# Altium PCB slave.PcbDoc (part 4 of 7)
Units mil, origin at the board's own origin, x right, y up, seen from the top; angles counter-clockwise.
Board outline 6299.21 x 3937.01 mil, 6 copper layers (Top Copper, FUSED_VBAT-, Signal Layer 2, Signal Layer 3, VREG, Bot Copper), stack 65.355 mil thick; 495 components, 307 nets, 1435 pads, 1866 vias.
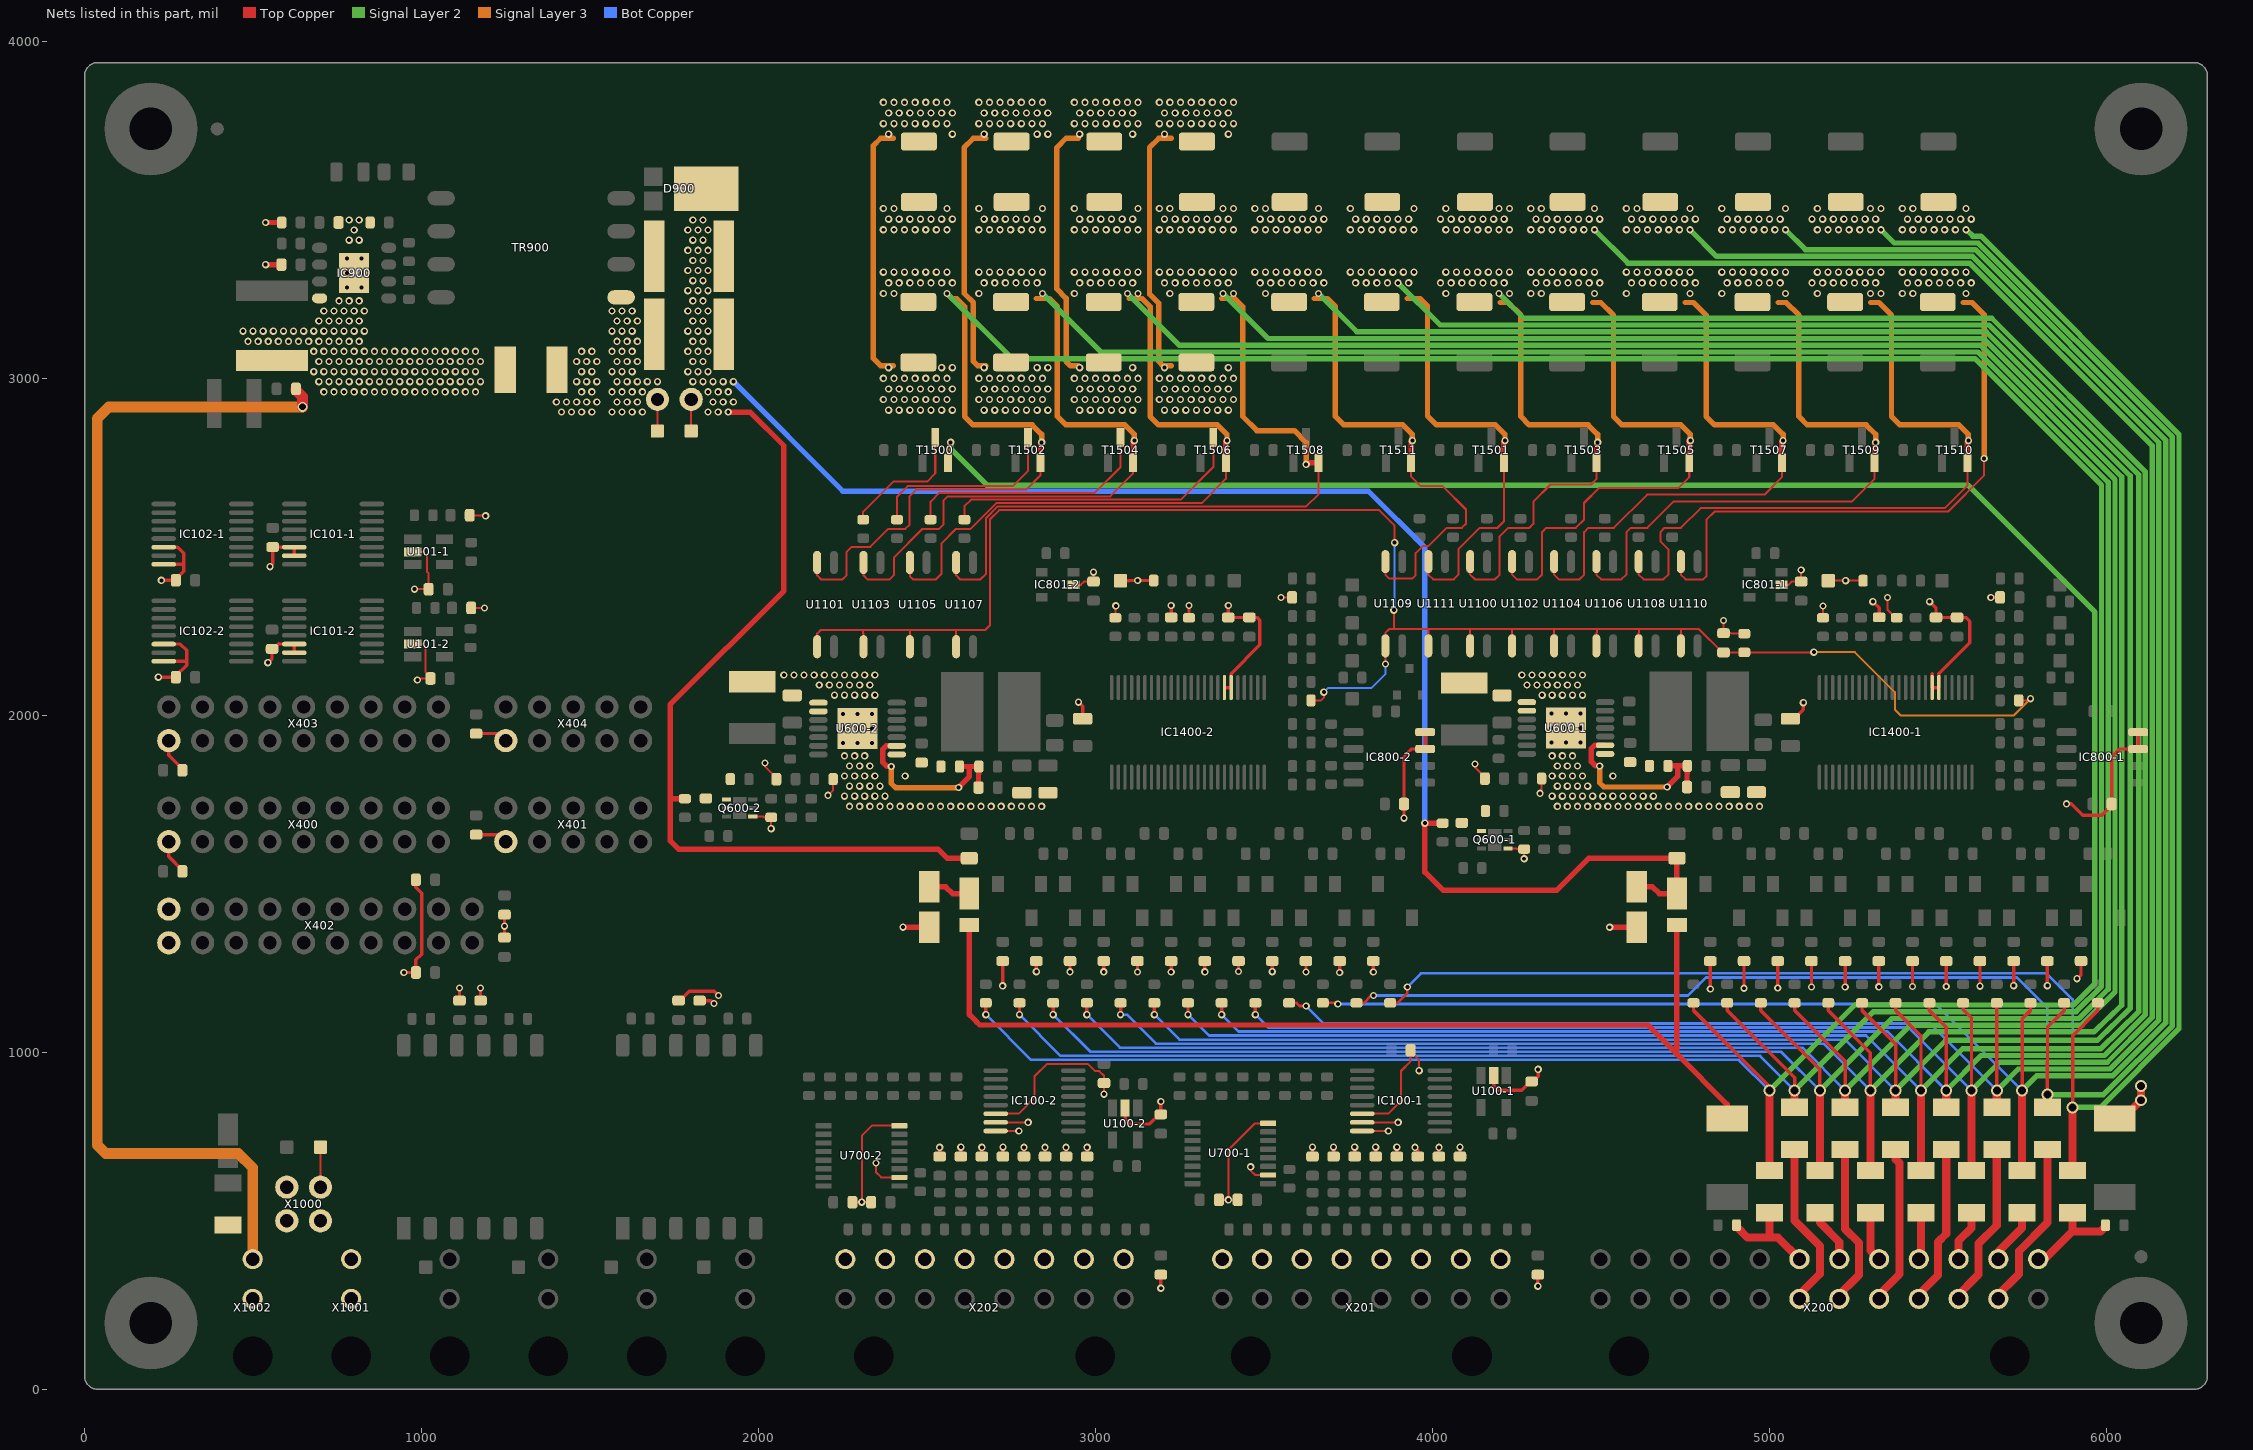
[diagram p7: the nets of this part, all layers, seen from the top]

## Via types
v1: diameter 21.65, hole 11.81, Top Copper to Bot Copper, tented both sides, 1848 vias
v2: diameter 35.43, hole 23.62, Top Copper to Bot Copper, 15 vias
v3: diameter 29.53, hole 19.68, Top Copper to Bot Copper, tented both sides, 3 vias

## Nets (pads, with @x,y where several pads share a name; then routed paths per layer and width w, separated by ;. In a path a pad name is that pad's centre, name@x,y a point inside that pad or via, vN(x,y) a via of type N, cw(c..) or ccw(c..) an arc to the next point about the centre after c; other vN are vias at no path point) (continued)
CELL8_FEEDBACK+: R1107.1 R1520.2 R1521.2 T1506.3 | length 1680
  Top Copper w6: R1107.1@2610.52,2580.78 2610.52,2620 2630.52,2640 3252.2,2640 3349.21,2737.01 T1506.3@3349.21,2824.41 T1506.3@3349.21,2826.38
  Signal Layer 3 w16: 3224.21,3037.01 3200.49,3037.01 3187.5,3050 3187.5,3222.5 3160,3250 3160,3685 3187.5,3712.5 3223.72,3712.5 3224.21,3712.01
  other v1: 3204.73,2905.52 3236.23,2905.52 3267.72,2905.52 3299.22,2905.52 3330.71,2905.52 3362.21,2905.52 3393.71,2905.52 3188.98,2937.01 3220.48,2937.01 3251.97,2937.01 3283.47,2937.01 3314.97,2937.01 3346.46,2937.01 3377.96,2937.01 3409.45,2937.01 3204.73,2968.51 3236.23,2968.51 3267.72,2968.51 3299.22,2968.51 3330.71,2968.51 3362.21,2968.51 3393.71,2968.51 3188.98,3000 3220.48,3000 3251.97,3000 3283.47,3000 3314.97,3000 3346.46,3000 3377.96,3000 3409.45,3000 3204.73,3031.5 3393.71,3031.5 3204.73,3724.41 3393.71,3724.41 3188.98,3755.91 3220.48,3755.91 3251.97,3755.91 3283.47,3755.91 3314.97,3755.91 3346.46,3755.91 3377.96,3755.91 3409.45,3755.91 3204.73,3787.41 3236.23,3787.41 3267.72,3787.41 3299.22,3787.41 3330.71,3787.41 3362.21,3787.41 3393.71,3787.41 3188.98,3818.9 3220.48,3818.9 3251.97,3818.9 3283.47,3818.9 3314.97,3818.9 3346.46,3818.9 3377.96,3818.9 3409.45,3818.9
CELL9_FEEDBACK+: R1105.1 R1514.2 R1515.2 T1504.3 | length 1511.4
  Top Copper w6: R1105.1@2510.52,2582.75 2510.52,2634.27 2536.25,2660 2997.2,2660 3074.21,2737.01 T1504.3@3074.21,2824.41 T1504.3@3074.21,2826.38
  Signal Layer 3 w16: v1@2949.21,3037.01 2925.49,3037.01 2912.5,3050 2912.5,3237.5 2885,3265 2885,3685 2912.5,3712.5 2948.72,3712.5 2949.21,3712.01
  other v1: 2952.76,2905.52 2984.26,2905.52 3015.75,2905.52 3047.25,2905.52 3078.74,2905.52 3110.24,2905.52 2937.01,2937.01 2968.51,2937.01 3000,2937.01 3031.5,2937.01 3063,2937.01 3094.49,2937.01 3125.99,2937.01 2952.76,2968.51 2984.26,2968.51 3015.75,2968.51 3047.25,2968.51 3078.74,2968.51 3110.24,2968.51 2937.01,3000 2968.51,3000 3000,3000 3031.5,3000 3063,3000 3094.49,3000 3125.99,3000 2952.76,3031.5 3110.24,3031.5 2952.76,3724.41 3110.24,3724.41 2937.01,3755.91 2968.51,3755.91 3000,3755.91 3031.5,3755.91 3063,3755.91 3094.49,3755.91 3125.99,3755.91 2952.76,3787.41 2984.26,3787.41 3015.75,3787.41 3047.25,3787.41 3078.74,3787.41 3110.24,3787.41 2937.01,3818.9 2968.51,3818.9 3000,3818.9 3031.5,3818.9 3063,3818.9 3094.49,3818.9 3125.99,3818.9
CELL10_FEEDBACK+: R1103.1 R1508.2 R1509.2 T1502.3 | length 1351.8
  Top Copper w6: R1103.1@2410.52,2582.75 2410.52,2648.02 2442.5,2680 2754.7,2680 2799.21,2724.51 T1502.3@2799.21,2824.41 T1502.3@2799.21,2826.38
  Signal Layer 3 w16: v1@2674.21,3037.01 2650.49,3037.01 2637.5,3050 2637.5,3225 2610,3252.5 2610,3685 2637.5,3712.5 2673.72,3712.5 2674.21,3712.01
  other v1: 2669.3,2905.52 2700.79,2905.52 2732.29,2905.52 2763.78,2905.52 2795.28,2905.52 2826.78,2905.52 2858.27,2905.52 2653.55,2937.01 2685.04,2937.01 2716.54,2937.01 2748.04,2937.01 2779.53,2937.01 2811.03,2937.01 2842.52,2937.01 2669.3,2968.51 2700.79,2968.51 2732.29,2968.51 2763.78,2968.51 2795.28,2968.51 2826.78,2968.51 2858.27,2968.51 2653.55,3000 2685.04,3000 2716.54,3000 2748.04,3000 2779.53,3000 2811.03,3000 2842.52,3000 2669.3,3031.5 2826.78,3031.5 2858.27,3031.5 2669.3,3724.41 2826.78,3724.41 2858.27,3724.41 2653.55,3755.91 2685.04,3755.91 2716.54,3755.91 2748.04,3755.91 2779.53,3755.91 2811.03,3755.91 2842.52,3755.91 2669.3,3787.41 2700.79,3787.41 2732.29,3787.41 2763.78,3787.41 2795.28,3787.41 2826.78,3787.41 2858.27,3787.41 2653.55,3818.9 2685.04,3818.9 2716.54,3818.9 2748.04,3818.9 2779.53,3818.9 2811.03,3818.9 2842.52,3818.9
CELL11_FEEDBACK+: R1101.1 R1502.2 R1503.2 T1500.3 | length 1160.2
  Top Copper w6: R1101.1@2310.52,2580.78 2310.52,2604.27 2400,2693.75 2500,2693.75 2524.21,2717.96 T1500.3@2524.21,2824.41 T1500.3@2524.21,2826.38
  Signal Layer 3 w16: 2399.21,3037.01 2362.99,3037.01 2340,3060 2340,3690 2362.5,3712.5 2398.72,3712.5 2399.21,3712.01
  other v1: 2385.83,2905.52 2417.33,2905.52 2448.82,2905.52 2480.32,2905.52 2511.82,2905.52 2543.31,2905.52 2574.81,2905.52 2370.08,2937.01 2401.58,2937.01 2433.07,2937.01 2464.57,2937.01 2496.07,2937.01 2527.56,2937.01 2559.06,2937.01 2385.83,2968.51 2417.33,2968.51 2448.82,2968.51 2480.32,2968.51 2511.82,2968.51 2543.31,2968.51 2574.81,2968.51 2370.08,3000 2401.58,3000 2433.07,3000 2464.57,3000 2496.07,3000 2527.56,3000 2559.06,3000 2385.83,3031.5 2543.31,3031.5 2574.81,3031.5 2385.83,3724.41 2574.81,3724.41 2370.08,3755.91 2401.58,3755.91 2433.07,3755.91 2464.57,3755.91 2496.07,3755.91 2527.56,3755.91 2559.06,3755.91 2385.83,3787.41 2417.33,3787.41 2448.82,3787.41 2480.32,3787.41 2511.82,3787.41 2543.31,3787.41 2574.81,3787.41 2370.08,3818.9 2401.58,3818.9 2433.07,3818.9 2464.57,3818.9 2496.07,3818.9 2527.56,3818.9 2559.06,3818.9
CELL_0+: F312.1 X200.2 | length 505.1
  Top Copper w24: X200.2@5669.29,271.65 5740,342.36 5740,410 5825,495 5824.21,495.79 F312.1@5824.21,711.91
CELL_0-: F313.1 SJ301.1 X200.13 | length 299.1
  Top Copper w24: X200.13@5797.29,386.42 5816.42,386.42 5899.21,469.21 ; F313.1@5899.21,524.41 5899.21,469.21 ; SJ301.1@5996.65,487.01 5996.65,483.07 5982.06,468.48 5899.94,468.48 5899.21,469.21
CELL_1+: F311.1 X200.14 | length 167.2
  Top Copper w24: X200.14@5678.78,386.42 5678.78,408.78 5749.21,479.21 F311.1@5749.21,524.41
CELL_2+: F310.1 X200.3 | length 500.7
  Top Copper w24: X200.3@5551.18,271.65 5620,340.47 5620,432.5 5674.21,486.71 F310.1@5674.21,711.91 F310.1@5674.21,721.36
CELL_3+: F309.1 X200.15 | length 153.9
  Top Copper w24: X200.15@5560.79,386.42 5560.79,440.79 5599.21,479.21 F309.1@5599.21,524.41
CELL_4+: F308.1 X200.4 | length 487.5
  Top Copper w24: X200.4@5433.07,271.65 5500,338.58 5500,437.5 5524.21,461.71 F308.1@5524.21,711.91 F308.1@5524.21,721.36
CELL_5+: F307.1 X200.16 | length 140.6
  Top Copper w24: X200.16@5442.8,386.42 5449.21,392.83 F307.1@5449.21,524.41
CELL_6+: F306.1 X200.5 | length 473.7
  Top Copper w24: X200.5@5314.96,271.65 5318.27,274.96 5385,341.7 5385,671.53 5374.21,682.32 F306.1@5374.21,711.91
CELL_7+: F305.1 X200.17 | length 148.6
  Top Copper w24: F305.1@5299.21,524.41 5299.21,412.02 X200.17@5324.81,386.42
CELL_8+: F304.1 X200.6 | length 494.8
  Top Copper w24: X200.6@5196.85,271.65 5265,339.8 5265,435 5224.21,475.79 F304.1@5224.21,711.91 F304.1@5224.21,721.36
CELL_9+: F303.1 X200.18 | length 161.9
  Top Copper w24: F303.1@5149.21,524.41 5149.21,494.82 5206.82,437.22 X200.18@5206.82,386.42
CELL_10+: F302.1 X200.7 | length 510.6
  Top Copper w24: F302.1@5074.21,721.36 F302.1@5074.21,711.91 5074.21,500.79 5150,425 5150,342.91 X200.7@5078.74,271.65
CELL_11+: F301.1 SJ300.2 X200.19 | length 305.7
  Top Copper w24: SJ300.2@4901.77,487.01 4901.77,483.07 4934.84,450 5000,450 ; F301.1@4999.21,524.41 4999.21,450.79 5000,450 ; X200.19@5088.78,386.42 5025.21,450 5000,450
EXT_DC_IN+: F900.1 X1000.1 X1000.3 X1001.1 X1002.1
EXT_DC_IN-: C903.1 C904.2 C905.1 C906.1 C907.1 IC900.4 IC900.9 R904.1 R905.1 TP903.1 X1000.2 X1000.4 X1001.2 X1002.2 | length 3813.9
  Top Copper w6: X1000.4@700,600 TP903.1@700,718.75
  Top Copper w16: v1(537.5,3337.5) C907.1@583.96,3337.5 ; v1(537.5,3462.5) R905.1@584.94,3462.5
  Top Copper w32: C904.2@627.12,2968.75 627.12,2964.81 646.6,2945.33 v3(646.6,2915.35)
  Signal Layer 3 w32: X1002.2@498.81,386.42 498.81,657.44 456.25,700 62.5,700 37.5,725 37.5,2881.25 71.6,2915.35 v3(646.6,2915.35)
  other v1: 710,2960 740,2960 770,2960 800,2960 830,2960 860,2960 890,2960 920,2960 950,2960 980,2960 1010,2960 1040,2960 1070,2960 1100,2960 1130,2960 1160,2960 695,2990 725,2990 755,2990 785,2990 815,2990 845,2990 875,2990 905,2990 935,2990 965,2990 995,2990 1025,2990 1055,2990 1085,2990 1115,2990 1145,2990 1175,2990 680,3020 710,3020 740,3020 770,3020 800,3020 830,3020 860,3020 890,3020 920,3020 950,3020 980,3020 1010,3020 1040,3020 1070,3020 1100,3020 1130,3020 1160,3020 695,3050 725,3050 755,3050 785,3050 815,3050 845,3050 875,3050 905,3050 935,3050 965,3050 995,3050 1025,3050 1055,3050 1085,3050 1115,3050 1145,3050 1175,3050 680,3080 710,3080 740,3080 770,3080 800,3080 830,3080 860,3080 890,3080 920,3080 950,3080 980,3080 1010,3080 1040,3080 1070,3080 1100,3080 1130,3080 1160,3080 485,3110 515,3110 545,3110 575,3110 605,3110 635,3110 665,3110 695,3110 725,3110 755,3110 785,3110 815,3110 470,3140 500,3140 530,3140 560,3140 590,3140 620,3140 650,3140 680,3140 710,3140 740,3140 770,3140 800,3140 830,3140 695,3170 725,3170 755,3170 785,3170 815,3170 710,3200 740,3200 770,3200 800,3200 830,3200 755,3230 785,3230 815,3230 778.35,3269.19 821.65,3269.19 778.35,3312.5 821.65,3312.5 778.35,3355.81 821.65,3355.81 785,3410 815,3410 800,3440 785,3470 815,3470
EXT_DC_ISO+: C600-1.1 C600-2.1 C900.2 C901.2 D900.1 D1400-1.2 D1400-2.2 D1401-1.1 D1401-2.1 Q600-1.4 Q600-2.4 R600-1.2 R600-2.2 R601-1.2 R601-2.2 R1400-1.1 R1401-2.1 TP900.1 X900.1 | length 7019.3
  Top Copper w6: TP900.1@1800,2843.75 X900.1@1800,2937.5
  Top Copper w16: R600-2.2@1781.25,1752.56 1741.19,1752.56 1737.5,1756.25 ; v1(1910,2900) 1975,2900 2075,2800 2075,2369.66 1737.5,2032.16 1737.5,1756.25 ; D1401-2.1@2506.25,1491.29 2555.09,1491.29 2575.42,1470.96 D1400-2.2@2625,1470.96 ; R1401-2.1@2618.75,1582.33 R1401-2.1@2625,1576.08 2559.1,1576.08 2532.19,1603 1762.5,1603 1737.5,1628 1737.5,1756.25 ; R600-1.2@4029.81,1680.02 v1(3977.06,1680.02) 3977.06,1534.95 4030.76,1481.25 4368.75,1481.25 4463.58,1576.08 R1400-1.1@4725,1576.08 D1400-1.2@4725,1470.96 4672.79,1470.96 4652.46,1491.29 D1401-1.1@4606.25,1491.29
  Bot Copper w16: X900.1@1800,2937.5 X900.1@1802.5,2935 ; v1(1925,2990) 2250,2665 3810,2665 3977.21,2497.79 3977.21,1680.17 v1(3977.06,1680.02)
  other v1: 1850,2900 1880,2900 1865,2930 1895,2930 1925,2930 1850,2960 1880,2960 1910,2960 1805,2990 1835,2990 1865,2990 1895,2990 1790,3020 1820,3020 1850,3020 1805,3050 1835,3050 1790,3080 1820,3080 1850,3080 1805,3110 1835,3110 1790,3140 1820,3140 1850,3140 1805,3170 1835,3170 1790,3200 1820,3200 1850,3200 1805,3230 1835,3230 1790,3260 1820,3260 1850,3260 1805,3290 1835,3290 1790,3320 1820,3320 1850,3320 1805,3350 1835,3350 1790,3380 1820,3380 1850,3380 1805,3410 1835,3410 1790,3440 1820,3440 1850,3440 1805,3470 1835,3470
FB_0: C605-1.1 R606-1.2 R610-1.1 U600-1.9 | length 565.4
  Top Copper w16: v1(4495.98,1849.97) 4483.48,1849.97 4470.98,1862.47 4470.98,1901.7 4480.56,1911.29 U600-1.9@4512.12,1911.29 ; v1(4695.98,1787.47) 4727.23,1818.72 4727.23,1849.97 ; R610-1.1@4698.53,1849.97 4727.23,1849.97 ; C605-1.1@4754.93,1787.47 4754.93,1827.27 4755.92,1828.25 R606-1.2@4755.92,1849.97 4727.23,1849.97
  Signal Layer 3 w16: v1(4495.98,1849.97) 4495.98,1799.97 4508.48,1787.47 v1(4695.98,1787.47)
FB_1: C605-2.1 R606-2.2 R610-2.1 U600-2.9 | length 565.4
  Top Copper w16: v1(2393.65,1848.23) 2381.15,1848.23 2368.65,1860.73 2368.65,1899.96 2378.23,1909.55 U600-2.9@2409.79,1909.55 ; v1(2593.65,1785.73) 2624.9,1816.98 2624.9,1848.23 ; R610-2.1@2596.21,1848.23 2624.9,1848.23 ; C605-2.1@2652.61,1785.73 2652.61,1825.53 2653.59,1826.51 R606-2.2@2653.59,1848.23 2624.9,1848.23
  Signal Layer 3 w16: v1(2393.65,1848.23) 2393.65,1798.23 2406.15,1785.73 v1(2593.65,1785.73)
FUSED_CELL_0+: F312.2 R1310-1.1 R1310-2.1 R1526.1 R1527.1 T1510.2 U1108.2 | length 8059.3
  Top Copper w6: U1108.2@4611.71,2456.25 4611.71,2417.8 4626.26,2403.25 4685.05,2403.25 4699.36,2417.57 4699.36,2492.72 4675.79,2516.3 4675.79,2543.75 4688.29,2556.25 4736.87,2556.25 4795.62,2615 5520,2615 5586.71,2681.71 5586.61,2681.81 T1510.2@5586.61,2749.61
  Top Copper w8: R1310-2.1@3774.21,1146.95 3795.93,1146.95 3817.73,1168.75 v1(3824.49,1168.75)
  Top Copper w10: v2(5824.21,874.51) 5824.51,1074.51 5874.21,1124.21 R1310-1.1@5874.21,1144.98
  Top Copper w16: T1510.2@5586.61,2749.61 5586.61,2811.61 v1(5590,2815)
  Top Copper w24: F312.2@5824.21,827.07 F312.2@5824.21,837.11 v2(5824.21,874.51)
  Signal Layer 2 w16: v1(5330.72,3440.95) 5369.87,3401.79 5618.65,3401.79 6195,2825.44 6195,1078.85 5990.66,874.51 v2(5824.21,874.51)
  Signal Layer 3 w16: 5300,3225 5324.04,3225 5361.71,3187.33 5361.71,2887.01 5386.71,2862.01 5561.71,2862.01 5590,2833.72 v1(5590,2815)
  Bot Copper w8: v1(3824.49,1168.75) 4757.73,1168.75 4811.32,1222.34 5733.67,1222.34 5824.21,1131.79 v2(5824.21,874.51)
  other v1: 5141.74,3251.97 5299.22,3251.97 5330.72,3251.97 5125.99,3283.47 5157.49,3283.47 5188.98,3283.47 5220.48,3283.47 5251.98,3283.47 5283.47,3283.47 5314.97,3283.47 5141.74,3314.97 5173.24,3314.97 5204.73,3314.97 5236.23,3314.97 5267.72,3314.97 5299.22,3314.97 5330.72,3314.97 5141.74,3440.95 5173.24,3440.95 5204.73,3440.95 5236.23,3440.95 5267.72,3440.95 5299.22,3440.95 5125.99,3472.45 5157.49,3472.45 5188.98,3472.45 5220.48,3472.45 5251.98,3472.45 5283.47,3472.45 5314.97,3472.45 5141.74,3503.94 5299.22,3503.94 5330.72,3503.94
FUSED_CELL_0-: F313.2 R1312-1.1 R1312-2.1 R1534.1 R1535.1 U1110.2 | length 7743.6
  Top Copper w6: U1110.2@4736.61,2456.25 4736.61,2417.8 4751.16,2403.25 4803,2403.25 4812.5,2412.75 4812.5,2580 4837.5,2605 5529.7,2605 5636.71,2712.01 v1(5636.71,2762.01)
  Top Copper w8: R1312-2.1@3874.21,1146.95 3895.93,1146.95 3925,1176.02 v1(3925,1193.75)
  Top Copper w10: v2(5899.21,837.01) 5899.51,1049.51 5974.21,1124.21 R1312-1.1@5974.21,1144.98
  Top Copper w24: F313.2@5899.21,639.57 F313.2@5899.21,649.61 v2(5899.21,837.01)
  Signal Layer 2 w16: v1(5582.68,3440.95) 5584.21,3440.95 5603.37,3421.79 5626.93,3421.79 6215,2833.73 6215,1070.57 5981.44,837.01 v2(5899.21,837.01)
  Signal Layer 3 w15.98: 5575,3225 5600.98,3225 5636.71,3189.27 v1(5636.71,2762.01)
  Bot Copper w8: v1(3925,1193.75) 3965.59,1234.34 5821.67,1234.34 5899.21,1156.79 v2(5899.21,837.01)
  other v1: 5393.71,3251.97 5425.2,3251.97 5582.68,3251.97 5409.46,3283.47 5440.95,3283.47 5472.45,3283.47 5503.94,3283.47 5535.44,3283.47 5566.94,3283.47 5598.43,3283.47 5393.71,3314.97 5425.2,3314.97 5456.7,3314.97 5488.2,3314.97 5519.69,3314.97 5551.19,3314.97 5582.68,3314.97 5393.71,3440.95 5425.2,3440.95 5456.7,3440.95 5488.2,3440.95 5519.69,3440.95 5551.19,3440.95 5409.46,3472.45 5440.95,3472.45 5472.45,3472.45 5503.94,3472.45 5535.44,3472.45 5566.94,3472.45 5598.43,3472.45 5393.71,3503.94 5425.2,3503.94 5582.68,3503.94
FUSED_CELL_1+: F311.2 R1308-1.1 R1308-2.1 R1522.1 R1523.1 T1509.2 U1106.2 | length 8152.7
  Top Copper w6: U1106.2@4485.92,2456.25 4485.92,2417.8 4500,2403.72 4500,2403.25 4560.45,2403.25 4575,2417.8 4575,2543.75 4587.5,2556.25 4637.5,2556.25 4716.25,2635 5245,2635 5311.71,2701.71 5311.61,2701.81 T1509.2@5311.61,2749.61
  Top Copper w8: R1308-2.1@3674.21,1146.95 3715.55,1146.95 v1(3718.75,1143.75)
  Top Copper w10: v2(5749.21,887.01) 5749.21,1099.21 5774.21,1124.21 R1308-1.1@5774.21,1144.98
  Top Copper w16: T1509.2@5311.61,2749.61 5311.61,2806.61 v1(5315,2810)
  Top Copper w24: F311.2@5749.21,639.57 F311.2@5749.21,649.61 v2(5749.21,887.01)
  Signal Layer 2 w16: v1(5047.25,3440.95) 5106.41,3381.79 5610.37,3381.79 6175,2817.16 6175,1087.13 6018.53,930.66 5792.86,930.66 v2(5749.21,887.01)
  Signal Layer 3 w16: 5025,3225 5049.04,3225 5086.71,3187.33 5086.71,2887.01 5111.71,2862.01 5286.71,2862.01 5315,2833.72 v1(5315,2810)
  Bot Copper w8: v1(3718.75,1143.75) 5492.47,1143.75 v2(5749.21,887.01)
  other v1: 4858.27,3251.97 5047.25,3251.97 4874.02,3283.47 4905.52,3283.47 4937.01,3283.47 4968.51,3283.47 5000.01,3283.47 5031.5,3283.47 4858.27,3314.97 4889.77,3314.97 4921.27,3314.97 4952.76,3314.97 4984.26,3314.97 5015.76,3314.97 5047.25,3314.97 4858.27,3440.95 4889.77,3440.95 4921.27,3440.95 4952.76,3440.95 4984.26,3440.95 5015.76,3440.95 4874.02,3472.45 4905.52,3472.45 4937.01,3472.45 4968.51,3472.45 5000.01,3472.45 5031.5,3472.45 4858.27,3503.94 5047.25,3503.94
FUSED_CELL_2+: F310.2 R1306-1.1 R1306-2.1 R1516.1 R1517.1 T1507.2 U1104.2 | length 8139.8
  Top Copper w6: U1104.2@4360.83,2456.25 4360.83,2417.8 4374.91,2403.72 4435.92,2403.72 4450,2417.8 4450,2543.75 4462.5,2556.25 4537.66,2556.25 4636.41,2655 4985,2655 5036.61,2706.61 5036.61,2747.64 T1507.2@5036.61,2749.61
  Top Copper w8: R1306-2.1@3574.21,1146.95 3595.93,1146.95 3605.38,1137.5 v1(3625,1137.5)
  Top Copper w10: v2(5674.21,887.01) R1306-1.1@5674.21,1144.98
  Top Copper w12: T1507.2@5036.61,2747.64 T1507.2@5036.71,2747.74
  Top Copper w16: T1507.2@5036.61,2749.61 5036.61,2811.61 v1(5040,2815) ; T1507.2@5036.71,2747.74 T1507.2@5040,2751.03
  Top Copper w24: F310.2@5674.21,827.07 F310.2@5674.21,837.11 v2(5674.21,887.01)
  Signal Layer 2 w16: v1(4763.79,3440.95) 4842.94,3361.79 5602.08,3361.79 6155,2808.87 6155,1095.42 6010.25,950.66 5737.86,950.66 v2(5674.21,887.01)
  Signal Layer 3 w16: 4750,3225 4774.04,3225 4811.71,3187.33 4811.71,2887.01 4836.71,2862.01 5011.71,2862.01 5040,2833.72 v1(5040,2815)
  Bot Copper w8: v1(3625,1137.5) 3676.67,1085.83 5475.39,1085.83 v2(5674.21,887.01)
  other v1: 4574.81,3251.97 4763.79,3251.97 4590.56,3283.47 4622.05,3283.47 4653.55,3283.47 4685.05,3283.47 4716.54,3283.47 4748.04,3283.47 4779.53,3283.47 4574.81,3314.97 4606.31,3314.97 4637.8,3314.97 4669.3,3314.97 4700.79,3314.97 4732.29,3314.97 4763.79,3314.97 4574.81,3440.95 4606.31,3440.95 4637.8,3440.95 4669.3,3440.95 4700.79,3440.95 4732.29,3440.95 4590.56,3472.45 4622.05,3472.45 4653.55,3472.45 4685.05,3472.45 4716.54,3472.45 4748.04,3472.45 4779.53,3472.45 4574.81,3503.94 4606.31,3503.94 4763.79,3503.94
FUSED_CELL_3+: F309.2 R1304-1.1 R1304-2.1 R1510.1 R1511.1 T1505.2 U1102.2 | length 8564.9
  Top Copper w6: U1102.2@4235.92,2456.25 4235.92,2417.33 4250,2403.25 4310.46,2403.25 4324.78,2417.57 4324.78,2543.79 4337.24,2556.25 4425,2556.25 4449.21,2580.46 4449.21,2630.07 4494.14,2675 4730,2675 4761.61,2706.61 T1505.2@4761.61,2749.61
  Top Copper w10: v1(3474.21,1112.01) R1304-2.1@3474.21,1144.98 ; R1304-1.1@5574.21,1144.98 5574.21,1125.79 5599.21,1100.79 v2(5599.21,887.01)
  Top Copper w16: T1505.2@4761.61,2749.61 4761.61,2811.61 v1(4765,2815)
  Top Copper w24: F309.2@5599.21,639.57 F309.2@5599.21,649.61 v2(5599.21,887.01)
  Signal Layer 2 w16: v1(4480.32,3440.95) 4579.48,3341.79 5593.8,3341.79 6135,2800.59 6135,1103.7 6001.96,970.66 5682.86,970.66 v2(5599.21,887.01)
  Signal Layer 3 w16: 4475,3225 4499.04,3225 4536.71,3187.33 4536.71,2887.01 4561.71,2862.01 4736.71,2862.01 4765,2833.72 v1(4765,2815)
  Bot Copper w8: v1(3474.21,1112.01) 3512.39,1073.83 5412.39,1073.83 v2(5599.21,887.01)
  other v1: 4291.34,3251.97 4322.84,3251.97 4480.32,3251.97 4307.09,3283.47 4338.59,3283.47 4370.09,3283.47 4401.58,3283.47 4433.08,3283.47 4464.57,3283.47 4496.07,3283.47 4291.34,3314.97 4322.84,3314.97 4354.34,3314.97 4385.83,3314.97 4417.33,3314.97 4448.83,3314.97 4480.32,3314.97 4291.34,3440.95 4322.84,3440.95 4354.34,3440.95 4385.83,3440.95 4417.33,3440.95 4448.83,3440.95 4307.09,3472.45 4338.59,3472.45 4370.09,3472.45 4401.58,3472.45 4433.08,3472.45 4464.57,3472.45 4496.07,3472.45 4291.34,3503.94 4322.84,3503.94 4480.32,3503.94
FUSED_CELL_4+: F308.2 R1302-1.1 R1302-2.1 R1504.1 R1505.1 T1503.2 U1100.2 | length 8457.2
  Top Copper w6: U1100.2@4111.71,2456.25 4111.71,2417.8 4125.79,2403.72 4125.79,2403.25 4185.13,2403.25 4199.21,2417.33 4199.21,2531.35 4224.11,2556.25 4287.5,2556.25 4299.21,2567.96 4299.21,2634.21 4350,2685 4470,2685 4486.71,2701.71 4486.61,2701.81 T1503.2@4486.61,2749.61
  Top Copper w10: v1(3374.21,1112.01) R1302-2.1@3374.21,1144.98 ; R1302-1.1@5474.21,1144.98 5474.21,1124.21 5524.21,1074.21 v2(5524.21,887.01)
  Top Copper w16: T1503.2@4486.61,2749.61 4486.61,2806.61 v1(4490,2810)
  Top Copper w24: F308.2@5524.21,827.07 F308.2@5524.21,837.11 v2(5524.21,887.01)
  Signal Layer 2 w16: v1(4196.86,3251.97) 4270.5,3178.33 5659.25,3178.33 6115,2722.58 6115,1111.99 5993.68,990.66 5627.86,990.66 v2(5524.21,887.01)
  Signal Layer 3 w16: 4200,3225 4224.04,3225 4261.71,3187.33 4261.71,2887.01 4286.71,2862.01 4461.71,2862.01 4490,2833.72 v1(4490,2810)
  Bot Copper w8: v1(3374.21,1112.01) 3424.39,1061.83 5349.39,1061.83 v2(5524.21,887.01)
  other v1: 4039.38,3251.97 4228.35,3251.97 4023.63,3283.47 4055.12,3283.47 4086.62,3283.47 4118.12,3283.47 4149.61,3283.47 4181.11,3283.47 4212.6,3283.47 4039.38,3314.97 4070.87,3314.97 4102.37,3314.97 4133.86,3314.97 4165.36,3314.97 4196.86,3314.97 4228.35,3314.97 4039.38,3440.95 4070.87,3440.95 4102.37,3440.95 4133.86,3440.95 4165.36,3440.95 4196.86,3440.95 4228.35,3440.95 4023.63,3472.45 4055.12,3472.45 4086.62,3472.45 4118.12,3472.45 4149.61,3472.45 4181.11,3472.45 4212.6,3472.45 4039.38,3503.94 4196.86,3503.94 4228.35,3503.94
FUSED_CELL_5+: F307.2 R1300-1.1 R1300-2.1 R1532.1 R1533.1 T1501.2 U1111.2 | length 8899
  Top Copper w6: U1111.2@3987.5,2456.25 3987.5,2417.8 4001.58,2403.72 4063.16,2403.72 4076.77,2417.33 4076.77,2493.25 4139.77,2556.25 4192.66,2556.25 4211.61,2575.2 T1501.2@4211.61,2749.61
  Top Copper w10: v1(3274.21,1112.01) R1300-2.1@3274.21,1144.98 ; R1300-1.1@5374.21,1144.98 5374.21,1124.21 5449.21,1049.21 v2(5449.21,887.01)
  Top Copper w16: T1501.2@4211.61,2749.61 4211.61,2811.61 v1(4215,2815)
  Top Copper w24: F307.2@5449.21,639.57 F307.2@5449.21,649.61 v2(5449.21,887.01)
  Signal Layer 2 w16: v1(3897.64,3283.47) 4022.79,3158.33 5650.97,3158.33 6095,2714.29 6095,1120.27 5982.07,1010.66 5572.86,1010.66 v2(5449.21,887.01)
  Signal Layer 3 w16: 3924.21,3237.01 3962.99,3237.01 3985,3215 3985,2888.72 4011.71,2862.01 4186.71,2862.01 4215,2833.72 v1(4215,2815)
  Bot Copper w8: v1(3274.21,1112.01) 3336.39,1049.83 5286.39,1049.83 v2(5449.21,887.01)
  other v1: 3771.66,3283.47 3803.16,3283.47 3834.65,3283.47 3866.15,3283.47 3929.14,3283.47 3755.91,3314.97 3787.41,3314.97 3818.9,3314.97 3850.4,3314.97 3881.9,3314.97 3913.39,3314.97 3944.89,3314.97 3755.91,3440.95 3787.41,3440.95 3818.9,3440.95 3850.4,3440.95 3881.9,3440.95 3913.39,3440.95 3944.89,3440.95 3771.66,3472.45 3803.16,3472.45 3834.65,3472.45 3866.15,3472.45 3897.64,3472.45 3929.14,3472.45 3755.91,3503.94 3944.89,3503.94
FUSED_CELL_6+: F306.2 R1311-1.1 R1311-2.1 R1528.1 R1529.1 T1511.2 U1109.2 | length 9104.1
  Top Copper w6: U1109.2@3860,2456.25 3860,2417.33 3871.57,2405.76 3940,2405.76 3950,2415.76 3950,2481.25 3971.06,2502.31 3987.52,2502.31 4041.46,2556.25 4086.62,2556.25 4099.21,2568.84 4099.21,2610.79 4030,2680 3965,2680 3936.61,2708.39 T1511.2@3936.61,2749.61
  Top Copper w10: v1(3174.21,1112.01) R1311-2.1@3174.21,1144.98 ; R1311-1.1@5274.21,1144.98 5274.21,1124.21 5374.21,1024.21 v2(5374.21,887.01)
  Top Copper w16: T1511.2@3936.61,2749.61 3936.61,2811.61 v1(3940,2815)
  Top Copper w24: F306.2@5374.21,827.07 F306.2@5374.21,837.11 v2(5374.21,887.01)
  Signal Layer 2 w16: v1(3661.42,3251.97) 3775.07,3138.33 5642.68,3138.33 6070,2711.01 6070,1130.29 5972.18,1035.52 5522.72,1035.52 v2(5374.21,887.01)
  Signal Layer 3 w16: 3649.21,3237.01 3687.99,3237.01 3711.71,3213.29 3711.71,2887.01 3736.71,2862.01 3911.71,2862.01 3940,2833.72 v1(3940,2815)
  Bot Copper w8: v1(3174.21,1112.01) 3248.39,1037.83 5223.39,1037.83 v2(5374.21,887.01)
  other v1: 3503.94,3251.97 3488.19,3283.47 3519.69,3283.47 3551.19,3283.47 3582.68,3283.47 3614.18,3283.47 3645.67,3283.47 3677.17,3283.47 3472.45,3314.97 3503.94,3314.97 3535.44,3314.97 3566.93,3314.97 3598.43,3314.97 3629.93,3314.97 3661.42,3314.97 3472.45,3440.95 3503.94,3440.95 3535.44,3440.95 3566.93,3440.95 3598.43,3440.95 3629.93,3440.95 3661.42,3440.95 3488.19,3472.45 3519.69,3472.45 3551.19,3472.45 3582.68,3472.45 3614.18,3472.45 3645.67,3472.45 3677.17,3472.45 3472.45,3503.94 3503.94,3503.94 3661.42,3503.94
FUSED_CELL_7+: F305.2 R1309-1.1 R1309-2.1 R1520.1 R1521.1 T1508.2 U1107.2 | length 10353.8
  Top Copper w6: U1107.2@2586.31,2453.71 2586.31,2415.26 2598.35,2403.22 2658.16,2403.22 2675.52,2420.57 2675.52,2585.52 2710,2620 3625,2620 3661.61,2656.61 T1508.2@3661.61,2749.61
  Top Copper w10: v1(3074.21,1112.01) R1309-2.1@3074.21,1144.98 ; R1309-1.1@5174.21,1144.98 5174.21,1124.21 5299.21,999.21 v2(5299.21,887.01)
  Top Copper w16: v1(3625,2745) 3629.61,2749.61 T1508.2@3661.61,2749.61
  Top Copper w24: F305.2@5299.21,639.57 F305.2@5299.21,649.61 v2(5299.21,887.01)
  Signal Layer 2 w16: v1(3377.96,3251.97) 3511.6,3118.33 5634.4,3118.33 6045,2707.73 6045,1140.31 5962.48,1060.57 5472.77,1060.57 v2(5299.21,887.01)
  Signal Layer 3 w16: 3374.21,3237.01 3412.99,3237.01 3436.71,3213.29 3436.71,2887.01 3478.72,2845 3590,2845 3625,2810 v1(3625,2745)
  Bot Copper w8: v1(3074.21,1112.01) 3092.81,1112.01 3179,1025.83 5160.39,1025.83 v2(5299.21,887.01)
  other v1: 3220.48,3251.97 3409.45,3251.97 3204.73,3283.47 3236.23,3283.47 3267.72,3283.47 3299.22,3283.47 3330.71,3283.47 3362.21,3283.47 3393.71,3283.47 3188.98,3314.97 3220.48,3314.97 3251.97,3314.97 3283.47,3314.97 3314.97,3314.97 3346.46,3314.97 3377.96,3314.97 3409.45,3314.97 3188.98,3440.95 3220.48,3440.95 3251.97,3440.95 3283.47,3440.95 3314.97,3440.95 3346.46,3440.95 3377.96,3440.95 3409.45,3440.95 3204.73,3472.45 3236.23,3472.45 3267.72,3472.45 3299.22,3472.45 3330.71,3472.45 3362.21,3472.45 3393.71,3472.45 3188.98,3503.94 3220.48,3503.94 3377.96,3503.94 3409.45,3503.94
FUSED_CELL_8+: F304.2 R1307-1.1 R1307-2.1 R1514.1 R1515.1 T1506.2 U1105.2 | length 10330.2
  Top Copper w6: U1105.2@2448.81,2453.71 2448.81,2413.16 2458.26,2403.71 2526.37,2403.71 2542.12,2419.46 2542.12,2509.52 2585.82,2553.22 2629.08,2553.22 2705.86,2630 3315,2630 3386.71,2701.71 3386.71,2781.07 3386.61,2781.17 T1506.2@3386.61,2749.61
  Top Copper w10: v1(2974.21,1112.01) R1307-2.1@2974.21,1144.98 ; R1307-1.1@5074.21,1144.98 5074.21,1124.21 5224.21,974.21 v2(5224.21,887.01)
  Top Copper w16: 3386.61,2781.17 3386.61,2811.61 v1(3390,2815)
  Top Copper w24: F304.2@5224.21,827.07 F304.2@5224.21,837.11 v2(5224.21,887.01)
  Signal Layer 2 w16: v1(3094.49,3251.97) 3248.14,3098.33 5626.11,3098.33 6025,2699.44 6025,1179.38 5926.19,1080.57 5417.77,1080.57 v2(5224.21,887.01)
  Signal Layer 3 w16: 3099.21,3237.01 3137.99,3237.01 3161.71,3213.29 3161.71,2887.01 3186.71,2862.01 3361.71,2862.01 3390,2833.72 v1(3390,2815)
  Bot Copper w8: v1(2974.21,1112.01) 3072.39,1013.83 3082.22,1013.83 3082.33,1013.94 3173.92,1013.94 3174.03,1013.83 5097.39,1013.83 v2(5224.21,887.01)
  other v1: 2937.01,3251.97 3125.99,3251.97 2952.76,3283.47 2984.26,3283.47 3015.75,3283.47 3047.25,3283.47 3078.74,3283.47 3110.24,3283.47 2937.01,3314.97 2968.51,3314.97 3000,3314.97 3031.5,3314.97 3063,3314.97 3094.49,3314.97 3125.99,3314.97 2937.01,3440.95 2968.51,3440.95 3000,3440.95 3031.5,3440.95 3063,3440.95 3094.49,3440.95 3125.99,3440.95 2952.76,3472.45 2984.26,3472.45 3015.75,3472.45 3047.25,3472.45 3078.74,3472.45 3110.24,3472.45 2937.01,3503.94 3125.99,3503.94
FUSED_CELL_9+: F303.2 R1305-1.1 R1305-2.1 R1508.1 R1509.1 T1504.2 U1103.2 | length 10669.6
  Top Copper w6: U1103.2@2311.31,2453.71 2311.31,2415.26 2322.86,2403.71 2388.8,2403.71 2402.21,2417.12 2402.21,2469.11 2486.32,2553.22 2535.52,2553.22 2548.02,2565.72 2548.02,2636.31 2561.71,2650 3043.56,2650 3111.61,2718.05 T1504.2@3111.61,2749.61
  Top Copper w10: v1(2874.21,1112.01) R1305-2.1@2874.21,1144.98 ; R1305-1.1@4974.21,1144.98 4974.21,1124.21 5149.21,949.21 v2(5149.21,887.01) v2@5149.51,887.01
  Top Copper w16: T1504.2@3111.61,2749.61 3111.61,2811.61 v1(3115,2815)
  Top Copper w24: F303.2@5149.21,639.57 F303.2@5149.21,649.61 v2(5149.21,887.01)
  Signal Layer 2 w16: v1(2842.52,3251.97) 3016.17,3078.33 5617.83,3078.33 6005,2691.16 6005,1187.67 5917.9,1100.57 5362.77,1100.57 v2(5149.21,887.01)
  Signal Layer 3 w16: 2824.21,3237.01 2862.99,3237.01 2886.71,3213.29 2886.71,2887.01 2911.71,2862.01 3086.71,2862.01 3115,2833.72 v1(3115,2815)
  Bot Copper w8: v1(2874.21,1112.01) 2984.39,1001.83 3087.19,1001.83 3087.3,1001.94 3168.94,1001.94 3169.06,1001.83 5034.39,1001.83 v2(5149.21,887.01)
  other v1: 2653.55,3251.97 2669.3,3283.47 2700.79,3283.47 2732.29,3283.47 2763.78,3283.47 2795.28,3283.47 2826.78,3283.47 2653.55,3314.97 2685.04,3314.97 2716.54,3314.97 2748.04,3314.97 2779.53,3314.97 2811.03,3314.97 2842.52,3314.97 2653.55,3440.95 2685.04,3440.95 2716.54,3440.95 2748.04,3440.95 2779.53,3440.95 2811.03,3440.95 2842.52,3440.95 2669.3,3472.45 2700.79,3472.45 2732.29,3472.45 2763.78,3472.45 2795.28,3472.45 2826.78,3472.45 2653.55,3503.94 2842.52,3503.94
FUSED_CELL_10+: F302.2 R1303-1.1 R1303-2.1 R1502.1 R1503.1 T1502.2 U1101.2 | length 10707.2
  Top Copper w6: U1101.2@2173.81,2453.71 2173.81,2415.26 2185.85,2403.22 2248.32,2403.22 2261.31,2416.21 2261.31,2485.39 2276.01,2500.09 2331.51,2500.09 2384.64,2553.22 2435.52,2553.22 2448.02,2565.72 2448.02,2650 2468.02,2670 2794.7,2670 2836.61,2711.91 T1502.2@2836.61,2749.61
  Top Copper w10: v1(2774.21,1112.01) R1303-2.1@2774.21,1144.98 ; R1303-1.1@4874.21,1144.98 4874.21,1124.21 5074.21,924.21 v2(5074.21,887.01) v2@5074.51,887.01
  Top Copper w16: T1502.2@2836.61,2749.61 2836.61,2806.61 v1(2840,2810)
  Top Copper w24: F302.2@5074.21,827.07 F302.2@5074.21,837.11 v2(5074.21,887.01)
  Signal Layer 2 w16: v1(2559.06,3251.97) 2752.71,3058.33 5609.54,3058.33 5985,2682.87 5985,1195.95 5909.62,1120.57 5307.77,1120.57 v2(5074.21,887.01)
  Signal Layer 3 w16: v1(2559.06,3251.97) 2574.02,3237.01 2587.99,3237.01 2611.71,3213.29 2611.71,2887.01 2636.71,2862.01 2811.71,2862.01 2840,2833.72 v1(2840,2810)
  Bot Copper w8: v1(2774.21,1112.01) 2896.39,989.83 3092.16,989.83 3092.28,989.94 3163.97,989.94 3164.09,989.83 4971.39,989.83 v2(5074.21,887.01)
  other v1: 2370.08,3251.97 2401.58,3251.97 2385.83,3283.47 2417.33,3283.47 2448.82,3283.47 2480.32,3283.47 2511.82,3283.47 2543.31,3283.47 2574.81,3283.47 2370.08,3314.97 2401.58,3314.97 2433.07,3314.97 2464.57,3314.97 2496.07,3314.97 2527.56,3314.97 2559.06,3314.97 2370.08,3440.95 2401.58,3440.95 2433.07,3440.95 2464.57,3440.95 2496.07,3440.95 2527.56,3440.95 2559.06,3440.95 2385.83,3472.45 2417.33,3472.45 2448.82,3472.45 2480.32,3472.45 2511.82,3472.45 2543.31,3472.45 2574.81,3472.45 2370.08,3503.94 2401.58,3503.94 2559.06,3503.94
FUSED_CELL_11+: F301.2 R1301-1.1 R1301-2.1 T1500.2 | length 8928.1
  Top Copper w6: T1500.2@2561.61,2749.61 2561.61,2801.61 v1(2570,2810)
  Top Copper w10: v1(2674.21,1112.01) R1301-2.1@2674.21,1144.98 ; R1301-1.1@4774.21,1144.98 4774.21,1124.21 4999.21,899.21 v2(4999.21,887.01)
  Top Copper w24: F301.2@4999.21,639.57 F301.2@4999.21,649.61 v2(4999.21,887.01)
  Signal Layer 2 w16: v1(2570,2810) 2571.08,2808.92 2571.08,2789.7 2677.52,2683.26 5588.32,2683.26 5965,2306.58 5965,1204.24 5901.34,1140.57 5252.77,1140.57 v2(4999.21,887.01)
  Bot Copper w8: v1(2674.21,1112.01) 2808.39,977.83 3097.13,977.83 3097.25,977.94 3127.75,977.94 3127.87,977.83 3128.38,977.83 3128.5,977.94 3159,977.94 3159.12,977.83 4908.39,977.83 v2(4999.21,887.01)
FUSED_VBAT+: D1400-1.1 D1400-2.1 F300.2 | length 3050
  Top Copper w16: D1400-2.1@2625,1377.46 2625,1112.5 2629.42,1108.08 2629.86,1108.08 2645.58,1092.36 2645.58,1091.92 2656.25,1081.25 4638.69,1081.25 4725,994.94 ; D1400-1.1@4725,1377.46 4725,994.94 ; F300.2@4874.21,803.15 4874.21,845.73 4725,994.94
FUSED_VBAT-: C100-1.1 C100-2.1 C101-1.1 C101-2.1 C102-1.1 C102-2.1 C103-1.1 C103-2.1 C104-1.1 C104-2.1 C105-1.1 C105-2.1 C106-1.1 C106-2.1 C107-1.1 C107-2.1 C108-1.1 C108-2.1 C109-1.1 C109-2.1 C110-1.1 C110-2.1 C111-1.1 C111-2.1 C112-1.1 C112-2.1 C113-1.1 C113-2.1 C114-1.1 C114-2.1 C115-1.1 C115-2.1 C400.1 C401.1 C402.1 C403.1 C404.1 C405.1 C406.1 C407.1 C602-1.1 C602-2.1 C603-1.1 C603-2.2 C604-1.2 C604-2.2 C606-1.2 C606-2.2 C607-1.1 C607-2.1 C608-1.1 C608-2.1 C700-1.1 C700-2.1 C701-1.1 C701-2.1 C800-1.1 C800-2.1 C801-1.1 C801-2.1 C900.1 C901.1 C903.2 C1100.1 C1300-1.2 C1300-2.2 C1301-1.2 C1301-2.2 C1304-1.2 C1304-2.2 C1305-1.2 C1305-2.2 C1308-1.2 C1308-2.2 C1309-1.2 C1309-2.2 C1312-1.2 C1312-2.2 C1313-1.2 C1313-2.2 C1316-1.2 C1316-2.2 C1317-1.2 C1317-2.2 C1320-1.2 C1320-2.2 C1321-1.2 C1321-2.2 C1400-1.2 C1400-2.2 C1401-1.1 C1401-2.1 C1402-1.1 C1402-2.1 C1403-1.1 C1403-2.1 C1404-1.1 C1404-2.1 C1405-1.1 C1405-2.1 D1401-1.2 D1401-2.2 F314.2 IC100-1.14 IC100-1.15 IC100-1.16 IC100-2.14 IC100-2.15 IC100-2.16 IC101-1.14 IC101-1.15 IC101-2.14 IC101-2.15 IC102-1.14 IC102-1.16 IC102-2.14 IC102-2.16 IC800-1.3 IC800-1.4 IC800-2.3 IC800-2.4 IC801-1.2 IC801-2.2 IC1400-1.30 IC1400-1.31 IC1400-2.30 IC1400-2.31 Q600-1.1 Q600-2.1 R608-1.1 R608-2.1 R609-1.2 R609-2.2 R610-1.2 R610-2.2 R1112.2 R1403-1.1 R1403-2.1 R1406-2.1 R1407-1.1 R1419-1.1 R1420-2.1 TP902.1 TP1403-1.1 TP1403-2.1 TR900.8 U100-1.2 U100-2.2 U101-1.2 U101-2.2 U600-1.1 U600-1.2 U600-1.8 U600-1.15 U600-2.1 U600-2.2 U600-2.8 U600-2.15 U700-1.2 U700-1.8 U700-2.2 U700-2.8 X201.9 X201.10 X201.11 X201.12 X201.13 X201.14 X201.15 X201.16 X202.9 X202.10 X202.11 X202.12 X202.13 X202.14 X202.15 X202.16 X400.18 X401.10 X402.19 X402.20 X403.18 X404.10 X900.2 | length 10045.9
  Top Copper w6: U101-2.2@973.42,2211.61 1003.01,2211.61 1011.03,2203.6 1011.03,2128.88 1026.46,2113.45 C112-2.1@1026.46,2109.51 983.17,2109.51 v1(987.5,2105.18) ; U101-1.2@973.42,2485 1003.01,2485 1016.77,2471.24 1016.77,2425.29 1020.67,2421.39 C112-1.1@1020.67,2374.51 v1(978.69,2374.51) ; C115-1.1@1142.85,2593.75 1188.5,2593.75 v1(1190.25,2592) ; C115-2.1@1147.29,2318.75 v1(1186.71,2318.75) ; TP902.1@1700,2843.75 X900.2@1700,2937.5 ; Q600-2.1@1982.92,1699.4 2013.82,1699.4 2015.78,1697.44 R608-2.1@2037.5,1697.44 v1(2037.5,1663.89) ; v1(2019.24,1858.92) 2019.24,1848.03 2052.61,1814.67 C604-2.2@2052.61,1810.73 ; v1(2206.15,1762.5) 2221.21,1777.56 R609-2.2@2221.21,1810.73 ; C700-2.1@2278.54,555.26 v1(2306.12,555.26) ; C701-2.1@2333.96,555.26 v1(2306.12,555.26) ; v1(2348.52,671.46) 2348.52,644.23 2363.98,628.78 U700-2.2@2417.66,628.78 ; U700-2.8@2417.66,782.32 2336.31,782.32 2306.18,752.2 2306.18,555.32 v1(2306.12,555.26) ; IC100-2.16@2703.59,766.68 v1(2772.08,766.68) ; IC100-2.15@2703.59,792.27 v1(2799.82,792.27) ; IC100-2.14@2703.59,817.86 2771.53,817.86 2818.75,865.08 2818.75,928.75 2856.04,966.04 2976.92,966.04 2998.68,944.28 3011.38,944.28 3025,930.66 C101-2.1@3025,908.96 v1(3025,875.79) ; IC801-2.2@2934.74,2387.5 2956.46,2387.5 2966.25,2397.29 C801-2.1@2993.75,2397.29 v1(2993.75,2424.9) v1@2993.75,2425 ; R1420-2.1@3060,2290.98 R1420-2.1@3058.59,2289.57 3058.59,2323.59 v1(3060,2325) ; C701-1.1@3366.04,562.5 v1(3393.75,562.5) ; C700-1.1@3421.46,562.5 v1(3393.75,562.5) ; v1(3460.34,660.48) 3460.34,649.11 3473.43,636.02 U700-1.2@3512.2,636.02 ; U700-1.8@3512.2,789.57 3473.06,789.57 3393.75,710.26 v1(3393.75,562.5) ; v1@3545.77,2350 v1(3549.9,2350) C111-2.1@3583.29,2350 ; IC100-1.16@3791.09,766.68 v1(3868.75,766.68) ; IC100-1.15@3791.09,792.27 v1(3897.73,792.27) ; IC100-1.14@3791.09,817.86 3868.01,817.86 3906.25,856.11 3906.25,944.61 3934.79,973.15 C101-1.1@3934.79,1002.31 ; C101-1.1@3934.79,1006.25 C101-1.1@3934.79,1002.31 ; v1(3960.19,945.82) 3960.19,976.92 C101-1.1@3934.79,1002.31 ; v1(4125.79,1855.75) 4125.79,1845.55 4154.93,1816.4 C604-1.2@4154.93,1812.47 ; Q600-1.1@4223.53,1605.06 4248.18,1605.06 4250.14,1603.1 R608-1.1@4271.86,1603.1 v1(4271.86,1574.51) ; v1(4318.75,1768.75) 4323.53,1773.53 R609-1.2@4323.53,1812.47 ; v1(4863.29,2281.25) C1100.1@4863.29,2243.75 4885.99,2243.75 4887.47,2242.28 R1112.2@4925,2242.28 ; IC801-1.2@5034.74,2387.5 5056.46,2387.5 5066.25,2397.29 C801-1.1@5093.75,2397.29 v1(5093.75,2431.25) ; R1419-1.1@5158.59,2289.57 v1(5158.59,2324.51) ; TP1403-1.1@5174.21,2399.51 v1(5225.79,2399.51) R1407-1.1@5277.44,2399.51 ; v1(5350,2349.51) 5350,2312.97 5373.4,2289.57 R1403-1.1@5377.34,2289.57
  Top Copper w10: v1(218.75,2113.29) C114-2.1@270.97,2113.29 270.97,2117.23 302.8,2149.06 302.8,2162.5 ; v1(227.87,2400.79) C114-1.1@270.97,2400.79 270.97,2404.73 293.75,2427.51 293.75,2450 ; IC102-2.16@234.84,2160.43 300.73,2160.43 302.8,2162.5 ; IC102-2.14@234.84,2211.61 284.23,2211.61 302.8,2193.04 302.8,2162.5 ; IC102-1.16@234.84,2447.93 291.68,2447.93 293.75,2450 ; IC102-1.14@234.84,2499.11 275.89,2499.11 293.75,2481.25 293.75,2450 ; X400.18@250,1625 250,1581.2 290.25,1540.95 C405.1@290.25,1537.01 ; X403.18@250,1925 250,1881.2 290.25,1840.95 C407.1@290.25,1837.01 ; v1(543.75,2156.25) 556.25,2168.75 C113-2.1@556.25,2197.25 560.19,2197.25 575.62,2212.68 576.68,2211.61 IC101-2.14@622.34,2211.61 IC101-2.15@622.34,2186.02 ; v1(550,2441.21) 558,2449.21 C113-1.1@558,2499.46 581.58,2499.46 581.93,2499.11 IC101-1.14@622.34,2499.11 IC101-1.15@622.34,2473.52 ; v1(947.39,1237.01) C403.1@983.17,1237.01 983.17,1274.42 1000,1291.25 1000,1472.48 983.17,1489.31 C400.1@983.17,1512.01 ; C1405-2.1@1112.5,1153.54 v1(1112.5,1191.21) ; C404.1@1161.71,1645.97 1229.03,1645.97 X401.10@1250,1625 ; C406.1@1161.71,1945.97 1229.03,1945.97 X404.10@1250,1925 ; C1404-2.1@1175,1153.54 v1(1175,1191.21) ; C402.1@1246.09,1340.55 v1(1246.09,1374.51) C401.1@1246.09,1408.47 ; C1405-1.1@1762.5,1153.54 1766.44,1153.54 1794.14,1181.25 1868.75,1181.25 v1(1881.25,1168.75) ; C1404-1.1@1825,1153.54 1858.93,1153.54 v1(1867.49,1144.98) ; C109-2.1@2537.5,691.04 v1(2537.5,718.33) ; C108-2.1@2600,691.04 v1(2600,718.77) ; C107-2.1@2662.5,691.04 v1(2662.5,718.33) ; v1(2724.21,1197.31) C1301-2.2@2724.21,1270.97 ; C106-2.1@2725,691.04 v1(2725,718.77) ; C105-2.1@2787.5,691.04 v1(2787.5,718.33) ; v1(2824.21,1239.57) C1305-2.2@2824.21,1270.97 ; C104-2.1@2850,691.04 v1(2850,718.33) ; C103-2.1@2912.5,691.04 v1(2912.5,718.27) ; v1(2924.21,1239.08) C1309-2.2@2924.21,1270.97 ; v1(2949.26,2039.27) 2961.71,2026.82 C1400-2.2@2961.71,1989.86 ; C102-2.1@2975,691.04 v1(2975,718.27) ; v1(3024.21,1239.08) C1313-2.2@3024.21,1270.97 ; TP1403-2.1@3074.21,2399.51 3097.9,2399.51 3098.39,2400 v1(3125,2400) R1406-2.1@3172.44,2400 ; U100-2.2@3087.5,834.74 3087.5,802.75 3102.75,787.5 3161.27,787.5 3189.81,816.04 C110-2.1@3193.75,816.04 v1(3193.75,853.91) ; v1(3124.21,1238.29) C1317-2.2@3124.21,1270.97 ; v1(3193.75,300) C100-2.1@3193.75,340.21 ; v1(3224.21,1238.29) C1321-2.2@3224.21,1270.97 ; C1403-2.1@3224.21,2290.55 v1(3224.21,2326.13) v1@3224.21,2331.25 ; R1403-2.1@3277.34,2289.57 v1(3277.34,2326.13) ; v1(3324.21,1239.08) C1300-2.2@3324.21,1270.97 ; IC1400-2.31@3382.48,2082.38 IC1400-2.30@3402.16,2082.38 3402.16,2123.79 3487.43,2209.05 3487.43,2282.07 3478.95,2290.55 C1402-2.1@3456.25,2290.55 C1401-2.1@3393.71,2290.55 v1(3393.71,2326.08) ; v1(3424.21,1239.86) C1304-2.2@3424.21,1270.97 ; v1(3524.21,1239.57) C1308-2.2@3524.21,1270.97 ; v1(3624.21,1238.29) C1312-2.2@3624.21,1270.97 ; C109-1.1@3643.75,691.04 v1(3643.75,718.75) ; C108-1.1@3706.25,691.04 v1(3706.25,718.75) ; v1(3724.21,1237.01) C1316-2.2@3724.21,1270.97 ; C107-1.1@3768.75,691.04 v1(3768.75,718.75) ; v1(3824.21,1238.29) C1320-2.2@3824.21,1270.97 C1320-2.2@3825,1270.18 ; C106-1.1@3831.25,691.04 v1(3831.25,718.75) ; C105-1.1@3893.75,691.04 v1(3893.75,718.65) ; v1(3915.25,1695) C800-2.1@3915.25,1737.01 3915.25,1877.66 3937.85,1900.25 IC800-2.3@3977.87,1900.25 IC800-2.4@3977.87,1950.25 ; v1(3947.73,718.33) 3956.25,709.81 C104-1.1@3956.25,691.04 ; C103-1.1@4018.75,691.04 v1(4018.75,718.33) ; C102-1.1@4081.25,691.04 v1(4081.25,718.77) ; U100-1.2@4181.26,931.1 4181.26,901.51 4195.28,887.5 4264.14,887.5 4289.93,913.29 C110-1.1@4293.87,913.29 4297.8,913.29 4313.23,928.72 v1(4313.23,949.48) ; v1(4312.5,306.25) C100-1.1@4312.5,340.21 ; v1(4824.21,1188.29) C1301-1.2@4824.21,1270.97 ; v1(4924.21,1190.21) C1305-1.2@4924.21,1270.97 ; v1(5024.21,1191.21) C1309-1.2@5024.21,1270.97 ; C1400-1.2@5061.71,1989.86 5072.54,1989.86 5100,2017.33 v1(5100,2037.5) ; v1(5124.21,1193.77) C1313-1.2@5124.21,1270.97 ; v1(5224.21,1193.75) C1317-1.2@5224.21,1270.97 ; v1(5306.25,2337.5) 5325,2318.75 C1403-1.1@5325,2291.04 ; v1(5324.21,1194.56) C1321-1.2@5324.21,1270.97 ; v1(5424.21,1195.35) C1300-1.2@5424.21,1270.97 ; v1(5475,2337.51) 5493.75,2318.76 C1401-1.1@5493.75,2290.55 C1402-1.1@5556.25,2290.55 5581.89,2290.55 5593.75,2278.69 5593.75,2215.37 5502.16,2123.79 IC1400-1.30@5502.16,2082.38 IC1400-1.31@5482.48,2082.38 5482.48,2123.79 ; v1(5524.21,1195.35) C1304-1.2@5524.21,1270.97 ; v1(5624.21,1196.52) C1308-1.2@5624.21,1270.97 ; v1(5656.35,2350) C111-1.1@5683.96,2350 ; v1(5724.21,1197.8) C1312-1.2@5724.21,1270.97 ; v1(5824.21,1197.8) C1316-1.2@5824.21,1270.97 ; v1(5881.2,1737.5) 5894.89,1737.5 5929.34,1703.05 5985.23,1703.05 6015.25,1733.07 C800-1.1@6015.25,1737.01 6015.25,1877.75 6037.5,1900 IC800-1.3@6093.8,1900 IC800-1.4@6093.8,1950 ; v1@5909.84,1216.09 v1(5912.5,1218.75) 5924.21,1230.46 C1320-1.2@5924.21,1270.97
  Top Copper w16: v1(2428.49,1371.49) 2428.78,1371.21 D1401-2.2@2506.25,1371.21 ; v1(4525.28,1371.21) D1401-1.2@4606.25,1371.21
  Top Copper w24: F314.2@6024.21,803.15 6047.64,803.15 v2(6102.36,857.88) v2(6102.36,900)
  other v1: 2270,1730 2300,1730 2330,1730 2360,1730 2390,1730 2420,1730 2450,1730 2480,1730 2510,1730 2540,1730 2570,1730 2600,1730 2630,1730 2660,1730 2690,1730 2720,1730 2750,1730 2780,1730 2810,1730 2840,1730 4370,1730 4400,1730 4430,1730 4460,1730 4490,1730 4520,1730 4550,1730 4580,1730 4610,1730 4640,1730 4670,1730 4700,1730 4730,1730 4760,1730 4790,1730 4820,1730 4850,1730 4880,1730 4910,1730 4940,1730 4970,1730 2255,1760 2285,1760 2315,1760 2345,1760 2375,1760 4355,1760 4385,1760 4415,1760 4445,1760 4475,1760 4505,1760 4535,1760 4565,1760 4595,1760 4625,1760 4655,1760 2270,1790 2300,1790 2330,1790 2360,1790 4370,1790 4400,1790 4430,1790 4460,1790 2255,1820 2285,1820 2315,1820 2345,1820 2435,1820 4355,1820 4385,1820 4415,1820 4445,1820 4535,1820 2270,1850 2300,1850 2330,1850 4370,1850 4400,1850 4430,1850 2255,1880 2285,1880 2315,1880 4355,1880 4385,1880 4415,1880 2250.34,1917.42 2293.65,1917.42 2336.96,1917.42 4352.67,1919.16 4395.98,1919.16 4439.28,1919.16 2250.34,1960.73 2293.65,1960.73 2336.96,1960.73 4352.67,1962.47 4395.98,1962.47 4439.28,1962.47 2250.34,2004.04 2293.65,2004.04 2336.96,2004.04 4352.67,2005.77 4395.98,2005.77 4439.28,2005.77 2225,2060 2255,2060 2285,2060 2315,2060 2345,2060 4325,2060 4355,2060 4385,2060 4415,2060 4445,2060 2180,2090 2210,2090 2240,2090 2270,2090 2300,2090 2330,2090 4280,2090 4310,2090 4340,2090 4370,2090 4400,2090 4430,2090 2075,2120 2105,2120 2135,2120 2165,2120 2195,2120 2225,2120 2255,2120 2285,2120 2315,2120 2345,2120 4265,2120 4295,2120 4325,2120 4355,2120 4385,2120 4415,2120 4445,2120 1415,2900 1445,2900 1475,2900 1505,2900 1565,2900 1595,2900 1625,2900 1655,2900 1400,2930 1430,2930 1460,2930 1490,2930 1520,2930 1580,2930 1610,2930 1640,2930 1475,2960 1505,2960 1565,2960 1595,2960 1625,2960 1655,2960 1460,2990 1490,2990 1520,2990 1580,2990 1610,2990 1640,2990 1670,2990 1700,2990 1475,3020 1505,3020 1565,3020 1595,3020 1625,3020 1460,3050 1490,3050 1520,3050 1580,3050 1610,3050 1640,3050 1475,3080 1505,3080 1565,3080 1595,3080 1625,3080 1580,3110 1610,3110 1640,3110 1565,3140 1595,3140 1625,3140 1580,3170 1610,3170 1640,3170 1565,3200 1595,3200 1625,3200
GLOBAL-BALANCING-FEEDBACK: C1100.2 R1112.1 R1413-1.1 R1413-2.1 U1100.3 U1101.3 U1102.3 U1103.3 U1104.3 U1105.3 U1106.3 U1107.3 U1108.3 U1109.3 U1110.3 U1111.3 | length 5412.5
  Top Copper w6: U1101.3@2173.81,2203.71 2173.81,2242.16 2184.87,2253.22 2310.52,2253.22 ; U1103.3@2311.31,2203.71 2311.31,2242.16 2310.52,2242.95 2310.52,2253.22 ; U1105.3@2448.81,2203.71 2448.81,2253.22 ; U1107.3@2586.31,2203.71 2586.31,2253.22 ; R1413-2.1@3641.24,2044.51 3669.21,2044.51 3677.38,2052.68 3677.38,2068.64 v1(3677.49,2068.75) ; v1(3860,2152.4) U1109.3@3860,2206.25 3860,2244.7 3871.55,2256.25 3887.5,2256.25 ; v1(3885,2311.98) 3885,2258.75 3887.5,2256.25 ; v1(3887.5,2512.5) 3887.5,2562.5 3841.28,2608.72 2713.72,2608.72 2686.71,2581.71 2686.71,2266.91 2673.02,2253.22 2586.31,2253.22 ; U1111.3@3987.5,2206.25 3987.5,2256.25 ; U1100.3@4111.71,2206.25 4111.71,2255.46 4112.5,2256.25 ; U1102.3@4235.92,2206.25 4235.92,2256.25 ; U1104.3@4360.83,2206.25 4360.83,2254.58 4362.5,2256.25 ; U1106.3@4485.92,2206.25 4485.92,2244.7 4487.5,2246.28 4487.5,2256.25 ; U1108.3@4611.71,2206.25 4611.71,2244.7 4612.5,2245.49 4612.5,2256.25 ; U1110.3@4736.61,2206.25 4736.61,2255.36 4737.5,2256.25 ; v1(5131.25,2187.5) 5129.77,2186.02 5128.64,2187.16 R1112.1@4925,2187.16 4903.28,2187.16 4902.79,2186.66 C1100.2@4863.29,2186.66 4859.35,2186.66 4789.77,2256.25 4737.5,2256.25 ; R1413-1.1@5741.24,2044.51 5769.21,2044.51 v1(5774.21,2049.51) ; 2310.52,2253.22 2448.81,2253.22 ; 2448.81,2253.22 2586.31,2253.22 ; 3887.5,2256.25 3987.5,2256.25 ; 3987.5,2256.25 4112.5,2256.25 ; 4112.5,2256.25 4235.92,2256.25 ; 4235.92,2256.25 4362.5,2256.25 ; 4362.5,2256.25 4487.5,2256.25 ; 4487.5,2256.25 4612.5,2256.25 ; 4612.5,2256.25 4737.5,2256.25
  Signal Layer 3 w6: v1(5131.25,2187.5) 5252.95,2187.5 5371.83,2068.62 5371.83,2017.31 5389.62,1999.51 5724.21,1999.51 v1(5774.21,2049.51)
  Bot Copper w6: v1(3677.49,2068.75) 3690.62,2081.88 3819.38,2081.88 3860,2122.5 v1(3860,2152.4) ; v1(3885,2311.98) 3887.5,2314.48 v1(3887.5,2512.5)